# Altium PCB GamingMouse-v1.1.PcbDoc (part 1 of 3)
Units mil, origin at the board's own origin, x right, y up, seen from the top; angles counter-clockwise.
Board outline 3390 x 1696.57 mil, 2 copper layers (Top Layer, Bottom Layer), stack 61.811 mil thick; 112 components, 70 nets, 346 pads, 115 vias.
Unrouted connection lines stored in the file: 47.
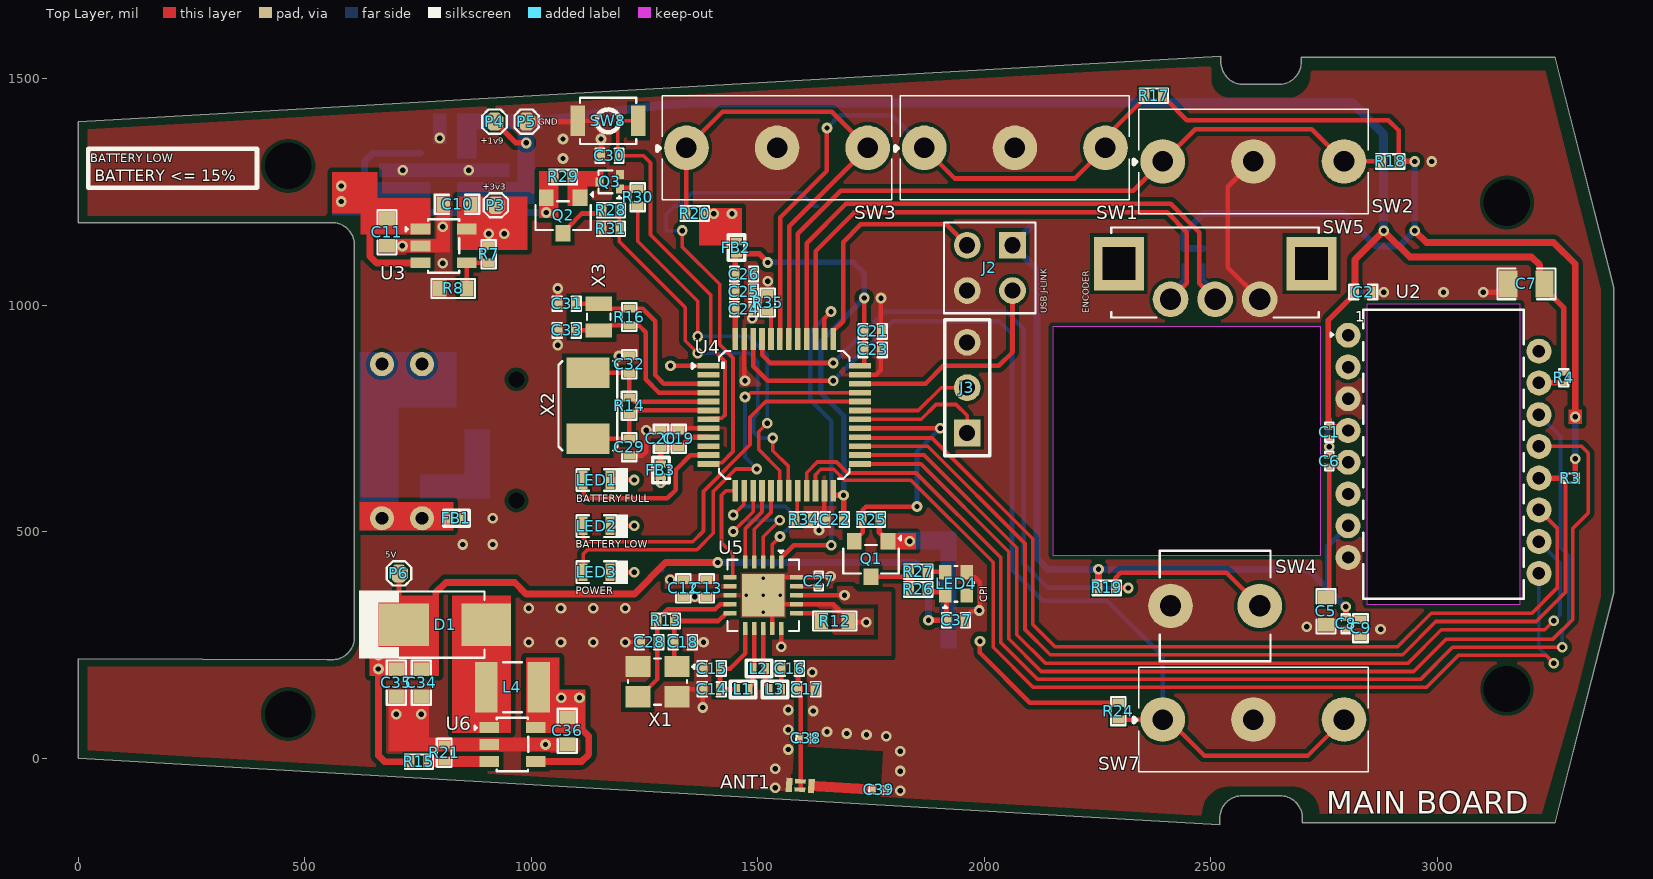
[diagram p0: Top Layer view]
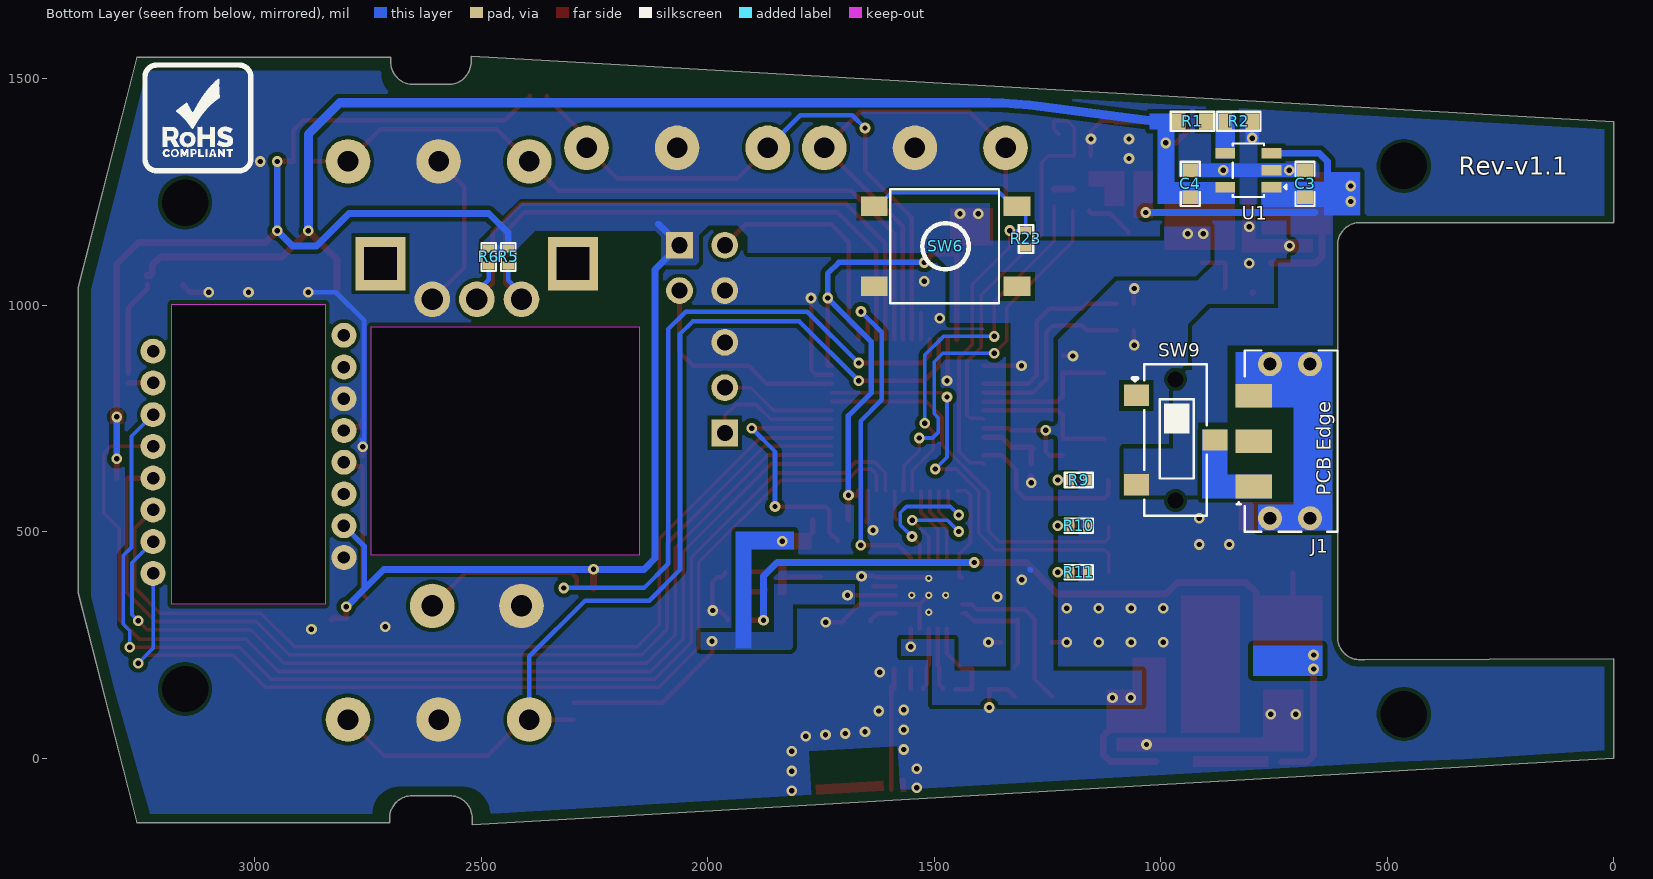
[diagram p1: Bottom Layer view, seen from below]
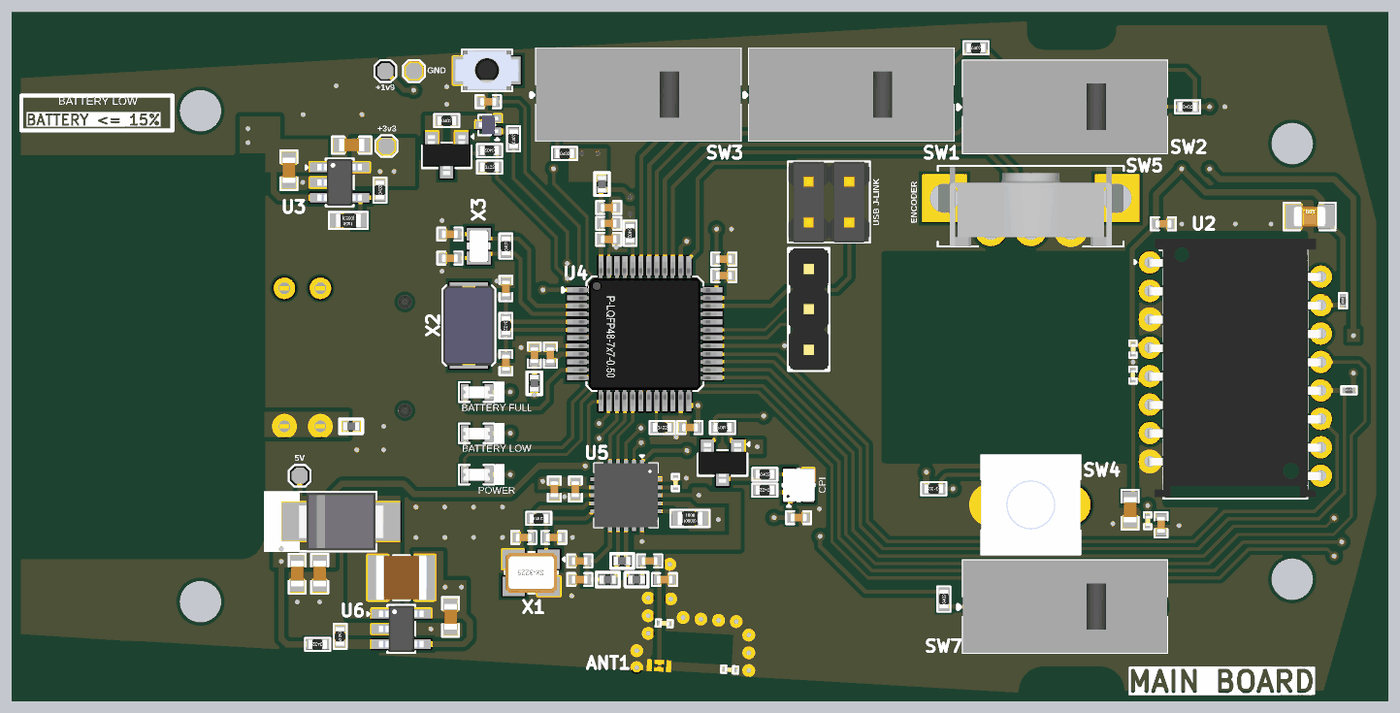
[diagram p3: 3D render of the assembled board from above, using the file's embedded part models]
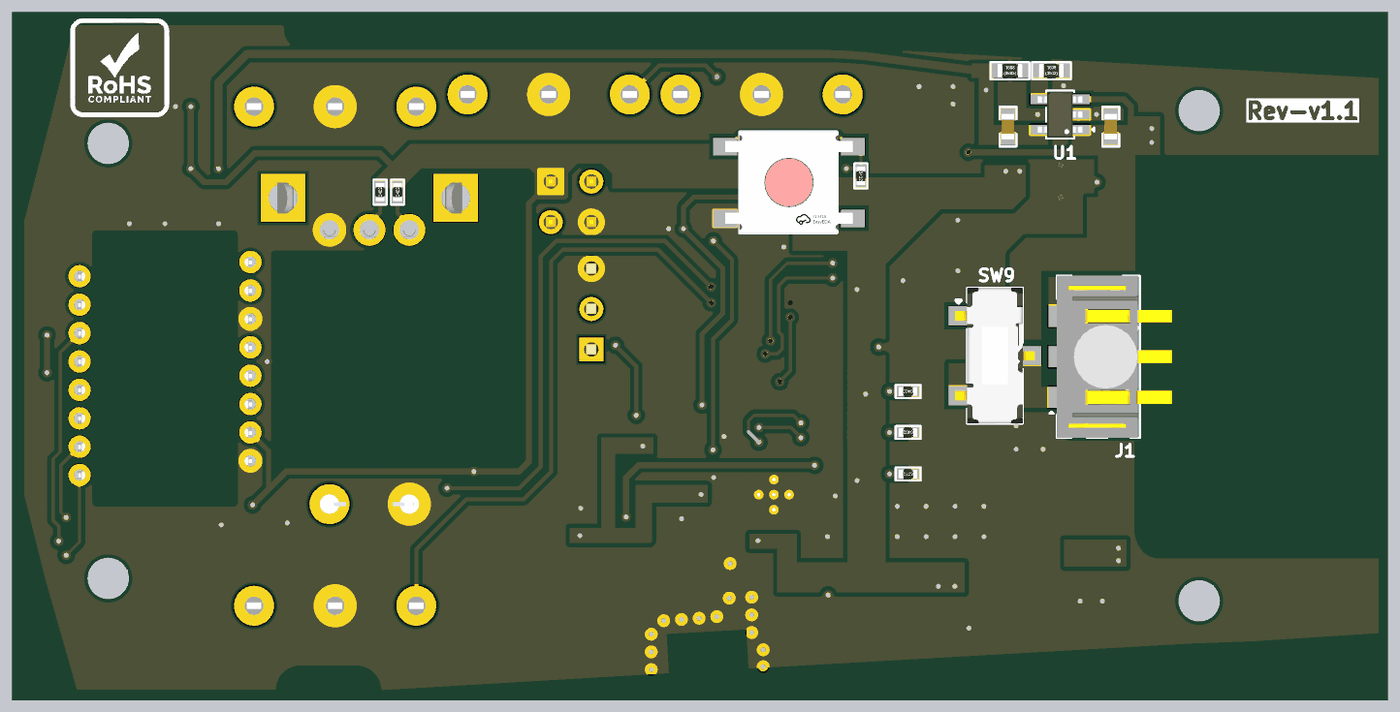
[diagram p4: 3D render of the assembled board from below, using the file's embedded part models]

## Layer stack, top to bottom
Top Solder: solder mask 0.3937, Solder Resist, Dk 3.5
Top Layer: signal copper 1.378
Dielectric 1: core 59.0551, FR-4, Dk 4.8
Bottom Layer: signal copper 1.378
Bottom Solder: solder mask 0.3937, Solder Resist, Dk 3.5

## Board outline
550,217.48 560,217.48 ccw(c560,267.48) 610,267.52 610,1132.48 ccw(c560.06,1132.54) 560,1182.48 0,1182.48 0,1405 2522.52,1550 2522.52,1537.52 ccw(c2572.46,1537.42) 2572.48,1487.48 2650,1487.48 ccw(c2650,1537.48) 2700,1537.52 2700,1547.48 3260,1547.48 3390,1040 3390,365 3260,-142.48 2702.52,-142.48 2702.52,-132.48 ccw(c2652.52,-132.48) 2652.52,-82.48 2570,-82.48 ccw(c2570,-132.48) 2520,-132.48 2520,-146.57 0,0 0,220
cut-out: 2844.6,340.22 3183.19,340.22 3183.19,1001.78 2844.6,1001.78
cut-out: 2151.69,448.47 2742.48,448.47 2742.48,952.4 2151.69,952.4

## Design rules (kind name [scope] priority, off if disabled: settings)
Clearance [All] p1: gap=10 ignorepadtopadclearanceinfootprint=TRUE except(5: Track-Track Track-THPad SMDPad-Fill; 7: Arc-Arc Arc-Track Arc-SMDPad Track-SMDPad SMDPad-SMDPad SMDPad-THPad Via-Region; 7.99: Track-Hole SMDPad-Hole THPad-Hole Via-Hole Fill-Hole Poly-Hole Region-Hole Text-Hole; 8: Arc-Hole Track-Region THPad-Poly)
HoleSize [All] p1: absolutevalues=TRUE maxlimit=150 minlimit=1 maxpercent=80.000 minpercent=20.000
MinimumSolderMaskSliver [All] p1: minsoldermaskwidth=0
PolygonConnect [All] p1: connectstyle=Direct reliefconductorwidth=15 reliefentries=4 polygonreliefangle="45 Angle" airgapwidth=10
RoutingVias [All] p1: holewidth=11.81 width=23.62 viastyle="Through Hole" minholewidth=11.81 minwidth=23.62 maxholewidth=11.81 maxwidth=23.62
SilkToSilkClearance [All] p1: silktosilkclearance=0
SilkToSolderMaskClearance [IsPad] p1: minsilkscreentomaskgap=0 clearancetoexposedcopper=TRUE
SolderMaskExpansion [All] p1: expansion=4 istentingtop=FALSE
SupplyNets "Schematic Supply Nets_5" [InNet('GND')] p1: voltage=0.000
SupplyNets "Schematic Supply Nets_4" [InNet('V_MON')] p2: voltage=0.000
SupplyNets "Schematic Supply Nets_3" [InNet('+1.9V')] p3: voltage=0.000
SupplyNets "Schematic Supply Nets_2" [InNet('5V')] p4: voltage=0.000
SupplyNets "Schematic Supply Nets_1" [InNet('V_BATT')] p5: voltage=0.000
SupplyNets "Schematic Supply Nets" [InNet('+3.3V')] p6: voltage=0.000
UnRoutedNet [All] p1: checkbadconnections=TRUE
Width Width_50OHM [InNet('ANT')] p1: maxlimit=10 minlimit=10 preferedwidth=10 impedanceprofiledriven=TRUE impedanceprofileid={56566DC3-D294-4734-A52A-A88B55A9F895} impedanceprofilevalue=50.000000 minimp=50.000000 maximp=50.000000 favimp=50.000000
Width [All] p2: maxlimit=40 minlimit=6 preferedwidth=12 minimp=50.000000 maximp=50.000000 favimp=50.000000
25 further rules are at their usual default settings.

## Components (designator, comment, footprint, x,y, rotation, side; value= is the part's Value field where it differs from the comment)
ANT1 "ANT016008LCS2442MA1" ANT016008LCS2442MA1 1593.86,-59.99 r176.8 top
C1 "0.1uF" CAP-0201 2761.86,720.01 r90 top
C2 "10uF" Cap-0402 2836.73,1029.01 r180 top
C3 "10uF" Cap-0603 681.68,1268.01 r270 bottom
C4 "10uF" Cap-0603 935.18,1268.01 r270 bottom
C5 "4.7uF" Cap-0603 2754.48,324.39 r90 top
C6 "0.1uF" CAP-0201 2761.86,656.16 r270 top
C7 "33uF" Cap-0805 3196.86,1047.01 r0 top
C8 "0.1uF" CAP-0201 2797.83,296.97 r90 top
C9 "10uF" Cap-0402 2830.82,287.39 r90 top
C10 "10uF" Cap-0603 836.39,1223.01 r0 top
C11 "10uF" Cap-0603 681.68,1161.01 r90 top
C12 "10nF" Cap-0402 1335.65,375.17 r90 top
C13 "1nF" Cap-0402 1387.65,375.17 r90 top
C14 "4.7pF" Cap-0402 1398.36,152.18 r0 top
C15 "2.2nF" Cap-0402 1398.36,198.11 r0 top
C16 "1.5pF" Cap-0402 1570.58,198.11 r0 top
C17 "1pF" Cap-0402 1607.58,152.18 r0 top
C18 "22PF" Cap-0402 1334.36,256.1 r0 top value=22pF
C19 "10nF" Cap-0402 1325.86,705.51 r270 top
C20 "1uF" Cap-0402 1286.43,705.51 r90 top
C21 "0.1uF" Cap-0402 1753.69,942.22 r180 top
C22 "0.1uF" Cap-0402 1669.95,527.01 r0 top
C23 "0.1uF" Cap-0402 1753.69,901.32 r180 top
C24 "0.1uF" Cap-0402 1469.78,991.01 r180 top
C25 "0.1uF" Cap-0402 1469.78,1030.01 r180 top
C26 "4.7uf" Cap-0402 1469.78,1069.01 r180 top
C27 "33nF" CAP-0201 1634.39,391.3 r270 top
C28 "22PF" Cap-0402 1260.36,256.1 r180 top value=22pF
C29 "22PF" Cap-0402 1216.36,686.91 r90 top value=22pF
C30 "0.1uF" Cap-0402 1172.86,1330.01 r0 top
C31 "DNP" Cap-0402 1078.36,1003.54 r0 top
C32 "22PF" Cap-0402 1216.36,869.58 r270 top value=22pF
C33 "DNP" Cap-0402 1078.36,944.48 r0 top
C34 "10uF" Cap-0603 757.36,166.94 r90 top
C35 "4.7uF" Cap-0603 702.24,166.94 r90 top
C36 "10uF" Cap-0603 1079.96,60.54 r90 top
C37 "0.1uF" Cap-0402 1937.86,304.96 r0 top
C38 "0.8pF" CAP-0201 1606.66,44.35 r176.8 top
C39 "6.2pF" CAP-0201 1767.51,-69.58 r176.8 top
D1 "SSB43L-E3/52T" SMB_ 810.31,295.01 r180 top
FB1 "100MHz" IND-0402 834.94,529.92 r0 top
FB2 "100MHz" IND-0402 1453.28,1127.06 r90 top
FB3 "100MHz" IND-0402 1286.43,635.96 r90 top
J1 "SIR1-03-S-S-K" SIR1-03-S-S-K 714.86,700 r90 bottom
J2 "G800LQ594032HR" "HDR 2X2" 2012.5,1082.5 r180 top
J3 "68000-103HLF" HDR1X3_ 1962.5,718.13 r90 top
L1 "2.7nH" IND-0402 1467.43,152.18 r180 top
L2 "8.2nH" IND-0402 1502.86,198.11 r180 top
L3 "3.9nH" IND-0402 1538.3,152.18 r0 top
L4 "DFE322520FD-4R7M=P2" IND-1210 958.78,156.94 r180 top
LED1 "Emerald" LED-0603 1144.34,614.31 r0 top
LED2 "RED" LED-0603 1144.34,512.56 r0 top
LED3 "White" LED-0603 1144.34,410.82 r0 top
LED4 "SK6812-EC20" SK6812-EC20 1937.86,384.99 r270 top
P3 "TEST POINT 0.5mm Dia" "Test-point - 0.5mm" 922.03,1220.74 r0 top
P4 "TEST POINT 0.5mm Dia" "Test-point - 0.5mm" 919.17,1405.27 r0 top
P5 "TEST POINT 0.5mm Dia" "Test-point - 0.5mm" 989.86,1405.27 r0 top
P6 "TEST POINT 0.5mm Dia" "Test-point - 0.5mm" 708.31,408.01 r0 top
Q1 "Si2302CDS" Sot-23 1750.2,440.01 r180 top
Q2 "AO3407" SOT-23 1070.44,1198.4 r180 top
Q3 "MMBT3904M" SOT-723 1173.61,1272.55 r90 top
R1 "2.5K" Res-0603 930.41,1406.01 r0 bottom
R2 "3.9K" Res-0603 828.04,1406.01 r0 bottom
R3 "10K" Res-0201 3293.91,618.45 r0 top
R4 "5.6R" Res-0201 3279.12,839.51 r90 top
R5 "10K" Res-0402 2440.53,1106.57 r90 bottom
R6 "10K" Res-0402 2483.51,1106.57 r90 bottom
R7 "6.8K" Res-0402 906.18,1112.26 r90 top
R8 "3.9K" Res-0603 828.04,1037.13 r0 top
R9 "330R" Res-0402 1181.36,614.31 r0 bottom
R10 "330R" Res-0402 1181.36,513.31 r0 bottom
R11 "330R" Res-0402 1181.36,410.82 r180 bottom
R12 "22K" Res-0603 1670.19,302.87 r180 top value=22kR
R13 "1M" Res-0402 1297.36,303.1 r0 top
R14 "1M" Res-0402 1216.36,778.24 r270 top
R15 "1M" Res-0402 752.46,-7.46 r180 top
R16 "DNP" Res-0402 1216.36,974.01 r90 top
R17 "10K" Res-0402 2374.52,1462.67 r0 top
R18 "10K" Res-0402 2896.19,1317.5 r0 top
R19 "10K" Res-0402 2270.71,376.01 r180 top
R20 "10K" Res-0402 1361.36,1202.3 r0 top
R21 "309K" Res-0402 807.96,12.04 r270 top value=309kR
R23 "10K" Res-0402 1297.95,1146.33 r270 bottom
R24 "10K" Res-0402 2295.72,104.09 r90 top
R25 "10K" Res-0402 1750.2,527.01 r180 top
R26 "10K" Res-0402 1854.36,372.74 r180 top
R27 "1K" Res-0402 1854.36,411.74 r0 top
R28 "120K" Res-0402 1176.24,1209.64 r180 top
R29 "1K" Res-0402 1070.44,1283.37 r0 top
R30 "4.7K" Res-0402 1235.18,1238.3 r90 top
R31 "330K" Res-0402 1176.24,1168.82 r0 top value=330kR
R34 "10K" Res-0402 1601.69,527.01 r0 top
R35 "10K" Res-0402 1522.34,1006.01 r270 top
SW1 "Kailh GM 8.0" "KAILH GM 8.0" 2067.75,1347.5 r0 top
SW2 "Kailh GM 8.0" "KAILH GM 8.0" 2594.25,1317.5 r0 top
SW3 "Kailh GM 8.0" "KAILH GM 8.0" 1542.86,1347.5 r0 top
SW4 "CMI629501D01" CMI629501D01 2509.76,336.39 r180 top
SW5 "E203-13G3-2412-00" E203-13G3-2412-00 2509.76,1052.64 r0 top
SW6 "GT-TS090C-H031-L5" GT-TS090C-H031-L5 1475.24,1130.18 r180 bottom
SW7 "Kailh GM 8.0" "KAILH GM 8.0" 2594.25,85.59 r0 top
SW8 "B3U-1000P" B3U-1000P 1169.86,1407.01 r180 top
SW9 "CL-SB-12B-02T" CL-SB-12B-02T 967.48,702.65 r270 bottom
U1 "LDK320M-R" SOT-23-5 806.86,1298.01 r0 bottom
U2 "PAW3395DM" PAW3395DM 3013.89,671 r0 top
U3 "LDK320M-R" SOT-23-5 806.86,1131.01 r0 top
U4 "STM32F103C8T6" "48-LQFP (7x7)_" 1558.86,758.01 r0 top
U5 "NRF24L01" "20-QFN (4x4)" 1512.39,359.8 r270 top
U6 "MT3540" SOT-23-5 958.78,30.54 r0 top
X1 "16MHz" SMD3225-4P 1278.86,169.1 r180 top
X2 "8MHz" SMD5032-2P 1125.36,778.24 r90 top
X3 "DNP" "2-SMD, (2.00mm x 1.20mm)" 1149.36,974.01 r90 top

## Footprints (in the part's own frame and the unit in brackets; to place one, negate y for a bottom-side part, rotate by r counter-clockwise, add the part's x,y. Pads: shape width x height; smd on the part's side, far side on the other; paste and mask are expansions set on the pad)
"2-SMD, (2.00mm x 1.20mm)" [mm]
  rect 0.8x1.5 smd: 1(-0.75,0) 2(0.75,0)
  silkscreen extent -0.15,-0.66 0.18,0.66, body extent -1,-0.6 1,0.6, height 0.35
"20-QFN (4x4)" [mm]
  rect 0.72x0.25 smd mask+0.07: 1(-1.87,1) 2(-1.87,0.5) 3(-1.87,0) 4(-1.87,-0.5) 5(-1.87,-1) 11(1.87,-1) 12(1.87,-0.5) 13(1.87,0) 14(1.87,0.5) 15(1.87,1)
  rect 0.25x0.72 smd mask+0.07: 6(-1,-1.87) 7(-0.5,-1.87) 8(0,-1.87) 9(0.5,-1.87) 10(1,-1.87) 16(1,1.87) 17(0.5,1.87) 18(0,1.87) 19(-0.5,1.87) 20(-1,1.87)
  round 0 / inner round 0.4 / far side round 0.4 hole 0.2: 21(-0.95,0) 21(0,0.95) 21(0,0) 21(0,-0.95) 21(0.95,0)
  rect 2.4x2.4 smd paste-2: 21(0,0)
  silkscreen extent -2.5,-2 2,2, body extent -2,-2 2,2, height 0.95
"48-LQFP (7x7)_" [mm]
  rect 1.22x0.32 smd: 1(-4.25,2.75) 2(-4.25,2.25) 3(-4.25,1.75) 4(-4.25,1.25) 5(-4.25,0.75) 6(-4.25,0.25) 7(-4.25,-0.25) 8(-4.25,-0.75) 9(-4.25,-1.25) 10(-4.25,-1.75) 11(-4.25,-2.25) 12(-4.25,-2.75) 25(4.25,-2.75) 26(4.25,-2.25) 27(4.25,-1.75) 28(4.25,-1.25) 29(4.25,-0.75) 30(4.25,-0.25) 31(4.25,0.25) 32(4.25,0.75) 33(4.25,1.25) 34(4.25,1.75) 35(4.25,2.25) 36(4.25,2.75)
  rect 0.32x1.22 smd: 13(-2.75,-4.25) 14(-2.25,-4.25) 15(-1.75,-4.25) 16(-1.25,-4.25) 17(-0.75,-4.25) 18(-0.25,-4.25) 19(0.25,-4.25) 20(0.75,-4.25) 21(1.25,-4.25) 22(1.75,-4.25) 23(2.25,-4.25) 24(2.75,-4.25) 37(2.75,4.25) 38(2.25,4.25) 39(1.75,4.25) 40(1.25,4.25) 41(0.75,4.25) 42(0.25,4.25) 43(-0.25,4.25) 44(-0.75,4.25) 45(-1.25,4.25) 46(-1.75,4.25) 47(-2.25,4.25) 48(-2.75,4.25)
  silkscreen extent -5.16,-3.58 3.66,3.58, body extent -4.51,-4.51 4.49,4.49, height 1.43
ANT016008LCS2442MA1 [mm]
  rect 0.35x0.8 smd paste-1 mask+0: 1(-0.625,0) 4(0.625,0)
  rect 0.6x0.26 smd paste-1 mask+0: 2(0,0.235) 3(0,-0.235)
B3U-1000P [mm] "SWITCH TACTILE SPST-NO 0.05A 12V"
  rect 0.82x1.72 smd: 1(-1.7,0) 2(1.7,0)
  silkscreen extent -1.57,-1.3 1.57,1.3, body extent -2,-1.26 2,1.24, height 1.6
CAP-0201 [mm]
  rect 0.3x0.3 smd mask+0.055: 1(-0.3,0) 2(0.3,0)
  silkscreen extent -0.53,-0.23 0.53,0.23, body extent -0.3,-0.15 0.3,0.15, height 0.28
Cap-0402 [mil]
  rect 18x25 smd mask+2.36: 1(-18.5,0) 2(18.5,0)
  silkscreen extent -31,-16 31,16, body extent -20,-10 20,10, height 19
Cap-0603 [mil]
  rect 30x35 smd mask+2.36: 1(-30,0) 2(30,0)
  silkscreen extent -49,-21 49,21, body extent -32,-16 31,16, height 34
Cap-0805 [mil] "SMD 0805"
  rect 40x60 smd mask+2.76: 1(-40,0) 2(40,0)
  silkscreen extent -64,-34 64,34, body extent -39,-25 39,25, height 30
CL-SB-12B-02T [mm]
  rect 1.2x1.4 smd paste+0 mask+0.051: 1(-2.5,-2.2) 2(0,2.2) 3(2.5,-2.2)
  round 0 hole 0.9 unplated: ""(-3.4,0) ""(3.4,0)
  silkscreen extent -4.25,-2.4 4.25,1.75, body extent -4.25,-2.5 4.25,2.5, height 5.5
CMI629501D01 [mm]
  round 2.5 hole 1.2: 1(-2.5,0) 2(2.5,0)
  silkscreen extent -3.1,-3.1 3.1,3.1, body extent -3.1,-3.1 3.1,3.1, height 9.5
E203-13G3-2412-00 [mm]
  rect 2.8x3 hole 1.82 square paste-2539.97 mask+0.051: 4(-5.4,1) 5(5.4,1)
  round 2 hole 1.2 paste-2539.97 mask+0.051: A(-2.5,-1) B(0,-1) C(2.5,-1)
  silkscreen extent -5.83,-2.02 5.82,3.02, body extent -5.79,-2.03 5.79,2.97, height 16.94
GT-TS090C-H031-L5 [mm]
  rect 1.5x1.1 smd paste+0 mask+0.051: 1(-4,2.25) 2(4,2.25) 3(-4,-2.25) 4(4,-2.25)
  silkscreen extent -3.1,-3.2 3,3.2, body extent -4,-3.2 4,3.2, height 4.91
HDR1X3_ [mm] "Connector; Header; 3 Position"
  rect 1.5x1.5 hole 0.9: 1(0,0)
  round 1.5 hole 0.9: 2(2.54,0) 3(5.08,0)
  silkscreen extent -1.27,-1.27 6.35,1.27, body extent -1.27,-1.24 6.35,1.25, height 8.54
"HDR 2X2" [mm]
  rect 1.5x1.5 hole 0.9: 1(-1.27,-1.27)
  round 1.5 hole 0.9: 2(-1.27,1.27) 3(1.27,-1.27) 4(1.27,1.27)
  silkscreen extent -2.57,-2.54 2.57,2.54, body extent -2.54,-2.54 2.54,2.54, height 9.5
IND-0402 [mm]
  rect 0.4x0.6 smd: 1(-0.35,0) 2(0.35,0)
  silkscreen extent -0.71,-0.46 0.71,0.46, body extent -0.5,-0.25 0.5,0.25, height 0.25
IND-1210 [mm]
  rect 1.27x2.81 smd: 1(-1.471,0) 2(1.471,0)
  silkscreen extent -0.52,-1.4 0.52,1.4, body extent -1.6,-1.4 1.6,1.4, height 2.5
"KAILH GM 8.0" [mm]
  round 2.5 hole 1.15: 1(-5.08,0) 2(0,0) 3(5.08,0)
  silkscreen extent -6.71,-2.92 6.43,2.92, body extent -6.4,-2.9 6.4,2.9, height 7.1
LED-0603 [mm]
  rect 0.5x1 smd: 1(-0.75,0) 2(0.75,0)
  silkscreen extent -1.12,-0.66 1.75,0.66, body extent -0.82,-0.37 0.82,0.36, height 0.68
PAW3395DM [mm]
  round 1.4 hole 0.7 paste-2539.97 mask+0.05: 1(-5.35,6.675) 2(-5.35,4.895) 3(-5.35,3.115) 4(-5.35,1.335) 5(-5.35,-0.445) 6(-5.35,-2.225) 7(-5.35,-4.005) 8(-5.35,-5.785) 9(5.35,-6.675) 10(5.35,-4.895) 11(5.35,-3.115) 12(5.35,-1.335) 13(5.35,0.445) 14(5.35,2.225) 15(5.35,4.005) 16(5.35,5.785)
  silkscreen extent -6.32,-8.1 4.5,8.1, body extent -5.45,-8.03 5.45,8.17, height 2.5
Res-0201 [mm]
  rect 0.27x0.37 smd mask+0.055: 1(-0.275,0) 2(0.275,0)
  silkscreen extent -0.48,-0.25 0.48,0.25, body extent -0.3,-0.15 0.3,0.15, height 0.29
Res-0402 [mil]
  rect 18x25 smd mask+2.17: 1(-18.5,0) 2(18.5,0)
  silkscreen extent -32,-17 32,16, body extent -23,-11 23,11, height 16
Res-0603 [mil]
  rect 30x35 smd: 1(-30,0) 2(30,0)
  silkscreen extent -48,-21 48,21, body extent -31,-17 31,17, height 18
SIR1-03-S-S-K [mm]
  rect 1.32x2.03 smd: 1(-2.54,2.035) 2(0,2.035) 3(2.54,2.035)
  round 1.35 hole 0.72: MH1(-4.32,1.125) MH2(4.32,1.125) MH3(4.32,-1.125) MH4(-4.32,-1.125)
  silkscreen extent -5.08,-2.67 5.08,3, body extent -5.08,-4.7 5.08,2.54, height 6.33
SK6812-EC20 [mm]
  rect 0.8x0.7 smd: 1(0.65,-0.6) 2(0.65,0.6) 3(-0.65,0.6) 4(-0.65,-0.6)
  silkscreen extent -1,-1 1.35,1, body extent -1,-1 1,1, height 0.65
SMB_ [mm]
  rect 2.8x2.4 smd: 1(-2.3,0) 2(2.3,0)
  silkscreen extent -2.21,-1.9 4.83,1.91, body extent -2.7,-1.8 2.7,1.8, height 2.3
SMD3225-4P [mm]
  rect 1.4x1.2 smd: 1(-1.1,-0.85) 2(1.1,-0.85) 3(1.1,0.85) 4(-1.1,0.85)
  silkscreen extent -2.08,-1.3 1.65,1.3, body extent -1.6,-1.25 1.6,1.25, height 0.81
SMD5032-2P [mm]
  rect 1.7x2.4 smd: 1(-1.85,0) 2(1.85,0)
  silkscreen extent -2.51,-1.65 2.51,1.65, body extent -2.5,-1.6 2.5,1.6, height 1.3
Sot-23 [mm] "TRANS NPN 40V 0.6A SOT23"
  rect 0.82x0.92 smd: 1(-0.95,-1) 2(0.95,-1) 3(0,1)
  silkscreen extent -1.68,-1.3 1.55,0.81, body extent -1.5,-1.25 1.5,1.25, height 1.05
SOT-23 [mm] "TRANS NPN 40V 0.6A SOT23"
  rect 0.82x0.92 smd: 1(-0.95,-1) 2(0.95,-1) 3(0,1)
  silkscreen extent -1.68,-1.3 1.55,0.81, body extent -1.5,-1.25 1.5,1.25, height 1.05
SOT-23-5 [mm]
  rect 1.1x0.6 smd: 1(-1.3,0.95) 2(-1.3,0) 3(-1.3,-0.95) 4(1.3,-0.95) 5(1.3,0.95)
  silkscreen extent -2.13,-1.5 0.88,1.5, body extent -1.4,-1.45 1.4,1.45, height 1.45
SOT-723 [mm]
  rect 0.5x0.45 smd: 1(-0.4,-0.575) 2(0.4,-0.575) 3(0,0.575)
  silkscreen extent -0.94,-0.66 0.64,0.64, body extent -0.6,-0.6 0.6,0.6, height 0.5
"Test-point - 0.5mm" [mm]
  oct 1x1 smd: 1(0,0)
  silkscreen extent -0.68,-0.68 0.68,0.68

## Part data
ANT1: "RF ANT 2.4GHZ CHIP SOLDER SMD", Clock Frequency=2.442GHz, Manufacturer=TDK, Category="RF Antennas", ComponentLink1Description=https://datasheet.ciiva.com/30000/rf-ant-ant016008lcs2442ma1-en-30000418.pdf?src-supplier=Avnet, ComponentLink1URL=https://datasheet.ciiva.com/30000/rf-ant-ant016008lcs2442ma1-en-30000418.pdf?src-supplier=Avnet, Height=0.016inch, Item Type=Antenna, Manufacturer Part Number=ANT016008LCS2442MA1, Mounting Technology="Surface Mount", Number of Bands=1, Packaging="Cut Tape", Pricing="1=0.2741, 10=0.2669, 25=0.2642, 100=0.2529, 250=0.2504, 500=0.2494, 1000=0.2485, 3000=0.2475, 6000=0.2466 (USD)", Reach SVHC Compliant=No, RoHS=Yes, RoHS Compliant=Yes, Series=-, Stock=9369, Supplier="Arrow Electronics", Supplier Part Number=ANT016008LCS2442MA1, Termination=Solder, VSWR=3
C1 C6 C8: library part GRM033C81E104KE14D, "CAP CER 0.1UF 25V X6S 0201", Capacitance=100nF, Case Code (Imperial)=0201, Case Code (Metric)=0603, Dielectric=X6S, Manufacturer=Murata, Max Operating Temperature=105°C, Min Operating Temperature=-55°C, Package Quantity=15000, Supplier Part Number 1=490-10403-1-ND, Tolerance=10%, Voltage Rating=25V, Case/Package=0201, Category="Ceramic Capacitors", ComponentLink1Description=http://www.mouser.com/ds/2/281/c02e-2905.pdf?src-supplier=Mouser, ComponentLink1URL=http://www.mouser.com/ds/2/281/c02e-2905.pdf?src-supplier=Mouser, ComponentLink2Description=http://www.farnell.com/datasheets/2722733.pdf?src-supplier=Farnell, ComponentLink2URL=http://www.farnell.com/datasheets/2722733.pdf?src-supplier=Farnell, ComponentLink3Description=http://search.murata.co.jp/Ceramy/image/img/A01X/G101/ENG/GRM033C81E104KE14-01.pdf?src-supplier=Digi-Key, ComponentLink3URL=http://search.murata.co.jp/Ceramy/image/img/A01X/G101/ENG/GRM033C81E104KE14-01.pdf?src-supplier=Digi-Key, Height=0.3mm, Length=0.024inch, Manufacturer Part Number=GRM033C81E104KE14D, Mount="Surface Mount", Packaging="Tape and Reel", Pricing 1="1=0.10000, 10=0.05100, 50=0.02780, 100=0.02260, 500=0.01616, 1000=0.01270, 2500=0.01155, 5000=0.01063 (USD)", RoHS=Yes, RoHS Compliant=Yes, Stock 1=91, Supplier 1=Digi-Key, Termination=SMD/SMT, Thickness=0.013inch, Voltage Rating (DC)=25V, Weight=1.2E-05oz, Width=0.3mm
C2 C9: library part CL05A106MP5NUNC, "CAP CER 10UF 10V X5R 0402", Case Code (Imperial)=0402, Case Code (Metric)=1005, Dielectric=X5R, LCSC Part Number=C315248, Manufacturer=Samsung, Max Operating Temperature=85°C, Min Operating Temperature=-55°C, Package Quantity=1, Tolerance=20%, Voltage Rating=10V, Capacitance=10uF, Case/Package=0402, Category="Ceramic Capacitors", ComponentLink1Description=https://datasheet.ciiva.com/25721/cl05a106mp5nunc-25721584.pdf?src-supplier=Digi-Key, ComponentLink1URL=https://datasheet.ciiva.com/25721/cl05a106mp5nunc-25721584.pdf?src-supplier=Digi-Key, ComponentLink2Description=https://datasheet.ciiva.com/26838/getdatasheetpartid-745310-26838170.pdf?src-supplier=Verical, ComponentLink2URL=https://datasheet.ciiva.com/26838/getdatasheetpartid-745310-26838170.pdf?src-supplier=Verical, Construction=Flat, Contact Plating=Tin, Depth=0.5mm, Item Type=Capacitor, Lead Free="Lead Free", Length=1mm, Manufacturer Part Number=CL05A106MP5NUNC, Mount="Surface Mount", Packaging="Tape and Reel", Pricing 1="10000=0.02537 (USD)", Radiation Hardening=No, RoHS=Yes, RoHS Compliant=Yes, Series=CL, Stock 1=1729850, Supplier 1=Avnet, Supplier Part Number 1=CL05A106MP5NUNC, Termination=Wraparound, Thickness=0.028inch, Width=0.02inch
C3 C4 C10 C11 C34 C36: library part C1608X5R1E106M080AC, "CAP CER 10UF 25V X5R 0603", Case Code (Imperial)=0603, Case Code (Metric)=1608, Dielectric=X5R, Dielectric Material=Ceramic, LCSC Part Number=C2168289, Manufacturer=TDK, Max Operating Temperature=85°C, Min Operating Temperature=-55°C, Package Quantity=1, Supplier Part Number 1=445-9015-1-ND, Tolerance=20%, Voltage Rating=25V, Capacitance=10uF, Case/Package=0603, Composition=Ceramic, Depth=0.8mm, Height=0.8mm, Item Type=Capacitor, Lead Free="Lead Free", Length=1.6mm, Manufacturer Part Number=C1608X5R1E106M080AC, Mount="Surface Mount", Packaging="Tape and Reel", Pricing 1="1=0.96, 10=0.704, 100=0.483, 500=0.38238, 1000=0.322 (USD)", REACH SVHC="No SVHC", Stock 1=61681, Supplier 1=Digi-Key, Termination=SMD/SMT, Thickness=0.039inch, Voltage Rating (DC)=25V, Weight=7.1E-05oz, Width=0.8mm
C5: library part C1608X5R1E475KT000E, "CAP CER, 4.7 µF, 25 V, 0603", Case Code (Imperial)=0603, Case Code (Metric)=1608, Dielectric=X5R, Dielectric Material=Ceramic, LCSC Part Number=C76615, Manufacturer=TDK, Max Operating Temperature=85°C, Min Operating Temperature=-55°C, Package Quantity=4000, Supplier Part Number 1=2220Y1000562GCT-ND, Tolerance=10%, Voltage Rating=25V, Capacitance=4.7uF, Case/Package=0603, Category="Ceramic Capacitors", ComponentLink1Description=https://datasheet.ciiva.com/48587/6print-detail-pdf-phplangenpart-noc1608x5r1e475k080acimp-unit-xmhz-48587141.pdf?src-supplier=Onlinecomponents.com, ComponentLink1URL=https://datasheet.ciiva.com/48587/6print-detail-pdf-phplangenpart-noc1608x5r1e475k080acimp-unit-xmhz-48587141.pdf?src-supplier=Onlinecomponents.com, ComponentLink2Description=https://datasheet.ciiva.com/24216/mlcc-commercial-general-en-24216326.pdf?src-supplier=Mouser, ComponentLink2URL=https://datasheet.ciiva.com/24216/mlcc-commercial-general-en-24216326.pdf?src-supplier=Mouser, ComponentLink3Description=https://datasheet.ciiva.com/48671/mlcc-commercial-general-en-48671304.pdf?src-supplier=Avnet, ComponentLink3URL=https://datasheet.ciiva.com/48671/mlcc-commercial-general-en-48671304.pdf?src-supplier=Avnet, Depth=0.8mm, Height=0.8mm, Item Type=Capacitor, Lead Free="Lead Free", Length=1.6mm, Manufacturer Part Number=C1608X5R1E475KT000E, Mount="Surface Mount", Packaging="Tape and Reel", Pricing 2="100=0.23400, 200=0.21900, 1000=0.20700, 2000=0.18700 (GBP)", REACH SVHC="No SVHC", Resistor Type=Ceramic, RoHS=No, Stock 2=16120, Supplier 1=Digi-Key, Supplier 2=RSComponents, Supplier Part Number 2=9159158P, Termination=SMD/SMT, Thickness=0.039inch, Voltage Rating (DC)=25V, Weight=7.1E-05oz, Width=0.031inch
C7: library part C2012X5R1A336MTJ00E, "10V 33uF X5R ±20% 0805 Multilayer Ceramic Capacitors MLCC - SMD/SMT ROHS", LCSC Part Number=C342635, Manufacturer=TDK, Package=0805, ComponentLink1Description=LCSC, ComponentLink1URL=https://www.lcsc.com/product-detail/Multilayer-Ceramic-Capacitors-MLCC-SMD-SMT_TDK-C2012X5R1A336MTJ00E_C342635.html, Item Type=Capacitor, Manufacturer Part Number=C2012X5R1A336MTJ00E
C12: library part CC0402KRX7R9BB103, "CAP CER 10000PF 50V X7R 0402", Case Code (Imperial)=0402, Case Code (Metric)=1005, Dielectric=X7R, LCSC Part Number=C60133, Manufacturer=Yageo, Max Operating Temperature=125°C, Min Operating Temperature=-55°C, Package Quantity=1, Resistor Type=Ceramic, Tolerance=10%, Voltage=50V, Capacitance=10nF, Case/Package=0402, Category="Ceramic Capacitors", ComponentLink1Description=https://datasheet.ciiva.com/11788/0900766b8079c870-11788375.pdf?src-supplier=RSComponents, ComponentLink1URL=https://datasheet.ciiva.com/11788/0900766b8079c870-11788375.pdf?src-supplier=RSComponents, ComponentLink2Description=https://datasheet.ciiva.com/26862/getdatasheetpartid-138248-26862642.pdf?src-supplier=Verical, ComponentLink2URL=https://datasheet.ciiva.com/26862/getdatasheetpartid-138248-26862642.pdf?src-supplier=Verical, ComponentLink3Description=https://datasheet.ciiva.com/7978/1489800-7978093.pdf?src-supplier=Element14, ComponentLink3URL=https://datasheet.ciiva.com/7978/1489800-7978093.pdf?src-supplier=Element14, ComponentLink4Description=https://datasheet.ciiva.com/28450/1489800-28450377.pdf?src-supplier=Element14, ComponentLink4URL=https://datasheet.ciiva.com/28450/1489800-28450377.pdf?src-supplier=Element14, ComponentLink5Description=https://datasheet.ciiva.com/176/mlccorderingcode-176349.pdf?src-supplier=Digi-Key, ComponentLink5URL=https://datasheet.ciiva.com/176/mlccorderingcode-176349.pdf?src-supplier=Digi-Key, ComponentLink6Description=https://datasheet.ciiva.com/176/mlccorderingcode-176348.pdf?src-supplier=Digi-Key, ComponentLink6URL=https://datasheet.ciiva.com/176/mlccorderingcode-176348.pdf?src-supplier=Digi-Key, ComponentLink7Description=https://datasheet.ciiva.com/176/mlccorderingcode-176350.pdf?src-supplier=Digi-Key, ComponentLink7URL=https://datasheet.ciiva.com/176/mlccorderingcode-176350.pdf?src-supplier=Digi-Key, Depth=0.5mm, Halogen Free="Halogen Free", Height=0.5mm, Item Type=Capacitor, Lead Free="Lead Free", Length=1mm, Manufacturer Part Number=CC0402KRX7R9BB103, Mount="Surface Mount", Packaging="Tape and Reel", Pricing 1="10000=0.00178 (USD)", Radiation Hardening=No, Reach SVHC Compliant=Yes, RoHS=Yes, RoHS Compliant=Yes, Series=CC, Stock 1=995000, Supplier 1=Avnet, Supplier Part Number 1=CC0402KRX7R9BB103, Termination=SMD/SMT, Thickness=0.022inch, Voltage Rating=50V, Voltage Rating (DC)=50V, Width=0.02inch
C13: library part CC0402KRX7R8BB102, "CAP CER 1000PF 25V X7R 0402", Case Code (Imperial)=0402, Case Code (Metric)=1005, Dielectric=X7R, Insulation Resistance=10GR, LCSC Part Number=C541372, Manufacturer=Yageo, Max Operating Temperature=125°C, Min Operating Temperature=-55°C, Tolerance=10%, Voltage Rating=25V, Capacitance=1nF, Case/Package=0402, Category="Ceramic Capacitors", ComponentLink1Description=https://datasheet.ciiva.com/26862/getdatasheetpartid-639817-26862638.pdf?src-supplier=Verical, ComponentLink1URL=https://datasheet.ciiva.com/26862/getdatasheetpartid-639817-26862638.pdf?src-supplier=Verical, ComponentLink2Description=https://datasheet.ciiva.com/5425/upy-gp-np0-16v-to-50v-8-3714-5425527.pdf?src-supplier=Mouser, ComponentLink2URL=https://datasheet.ciiva.com/5425/upy-gp-np0-16v-to-50v-8-3714-5425527.pdf?src-supplier=Mouser, Depth=0.5mm, Dissipation Factor=2.5%, Halogen Free="Halogen Free", Item Type=Capacitor, Lead Free="Lead Free", Length=1mm, Manufacturer Part Number=CC0402KRX7R8BB102, Mount="Surface Mount", Number of Pins=2, Packaging="Tape and Reel", Pricing 1="1=0.00230, 10000=0.00230, 100001=0.00190 (USD)", Radiation Hardening=No, RoHS=Yes, RoHS Compliant=Yes, Series=CC, Stock 1=370000, Supplier 1="Arrow Electronics", Supplier Part Number 1=CC0402KRX7R8BB102, Termination=SMD/SMT, Thickness=0.022inch, Voltage Rating (DC)=25V, Width=0.02inch
C14: library part CC0402BRNPO9BN4R7, "CAP CER 4.7PF 50V C0G/NPO 0402", Case Code (Imperial)=0402, Case Code (Metric)=1005, Dielectric=C0G, LCSC Part Number=C325453, Manufacturer=Yageo, Max Operating Temperature=125°C, Min Operating Temperature=-55°C, Package Quantity=10000, Supplier Part Number=8379141, Voltage Rating=50V, Case/Package=0402, Category="Ceramic Capacitors", ComponentLink1Description=https://datasheet.ciiva.com/11587/upy-gp-np0-16v-to-50v-8-11587134.pdf?src-supplier=Avnet, ComponentLink1URL=https://datasheet.ciiva.com/11587/upy-gp-np0-16v-to-50v-8-11587134.pdf?src-supplier=Avnet, ComponentLink2Description=https://datasheet.ciiva.com/13385/upy-gp-np0-16v-to-50v-8-13385886.pdf?src-supplier=Mouser, ComponentLink2URL=https://datasheet.ciiva.com/13385/upy-gp-np0-16v-to-50v-8-13385886.pdf?src-supplier=Mouser, Depth=0.5mm, Halogen Free=5694HalogenFree, Item Type=Capacitor, Lead Free="Lead Free", Length=1mm, Manufacturer Part Number=CC0402BRNPO9BN4R7, Mounting Technology="Surface Mount", Packaging="Tape and Reel", Pricing="10000=0.0031, 40000=0.0029, 150000=0.0027, 250000=0.0027, 500000=0.0025 (USD)", Radiation Hardening=No, RoHS=Yes, RoHS Compliant=Yes, Series=CC, Stock=80000, Supplier="Future Electronics", Termination=SMD/SMT, Voltage Rating (DC)=50V, Width=0.5mm
C15: library part 04025C222JAT2A, "CAP CER 2.2nF 50V X7R ±5% 0402 MLCC - SMD/SMT ROHS", LCSC Part Number=C597041, Manufacturer="Kyocera AVX", Package=0402, ComponentLink1Description=LCSC, ComponentLink1URL=https://www.lcsc.com/product-detail/Multilayer-Ceramic-Capacitors-MLCC-SMD-SMT_Kyocera-AVX-04025C222JAT2A_C597041.html, Item Type=Capacitor, Manufacturer Part Number=04025C222JAT2A
C16: library part CC0402BRNPO9BN1R5, "CAP CER 1.5PF 50V C0G/NPO 0402", LCSC Part Number=C282238, Manufacturer=Yageo, Supplier Part Number=6564710, Temperature Coefficient=30ppm/°C, Category="Ceramic Capacitors", ComponentLink1Description=https://datasheet.ciiva.com/15189/getdatasheetpartid-403423-15189101.pdf?src-supplier=Verical, ComponentLink1URL=https://datasheet.ciiva.com/15189/getdatasheetpartid-403423-15189101.pdf?src-supplier=Verical, ComponentLink2Description=https://datasheet.ciiva.com/11587/upy-gp-np0-16v-to-50v-8-11587119.pdf?src-supplier=Avnet, ComponentLink2URL=https://datasheet.ciiva.com/11587/upy-gp-np0-16v-to-50v-8-11587119.pdf?src-supplier=Avnet, ComponentLink3Description=https://datasheet.ciiva.com/13263/upy-gp-np0-16v-to-50v-8-3714-13263317.pdf?src-supplier=Mouser, ComponentLink3URL=https://datasheet.ciiva.com/13263/upy-gp-np0-16v-to-50v-8-3714-13263317.pdf?src-supplier=Mouser, Halogen Free=5694HalogenFree, Item Type=Capacitor, Manufacturer Part Number=CC0402BRNPO9BN1R5, Pricing="10000=0.0033, 40000=0.0031, 150000=0.003, 300000=0.0029, 750000=0.0027 (USD)", RoHS=Yes, Stock=530000, Supplier="Future Electronics"
C17: library part CC0402BRNPO9BN1R0, "CAP CER 1PF 50V C0G/NPO 0402", LCSC Part Number=C309455, Manufacturer=Yageo, Supplier Part Number=7847221, Temperature Coefficient=30ppm/°C, Category="Ceramic Capacitors", ComponentLink1Description=https://datasheet.ciiva.com/26862/getdatasheetpartid-403422-26862565.pdf?src-supplier=Verical, ComponentLink1URL=https://datasheet.ciiva.com/26862/getdatasheetpartid-403422-26862565.pdf?src-supplier=Verical, ComponentLink2Description=https://datasheet.ciiva.com/11587/upy-gp-np0-16v-to-50v-8-11587115.pdf?src-supplier=Avnet, ComponentLink2URL=https://datasheet.ciiva.com/11587/upy-gp-np0-16v-to-50v-8-11587115.pdf?src-supplier=Avnet, Halogen Free=5694HalogenFree, Item Type=Capacitor, Manufacturer Part Number=CC0402BRNPO9BN1R0, Pricing="10000=0.0034, 40000=0.0032, 150000=0.0031, 250000=0.003, 500000=0.0028 (USD)", RoHS=Yes, Stock=180000, Supplier="Future Electronics"
C18 C28 C29 C32: library part CC0402JRNPO9BN220, "CAP CER 22PF 50V C0G/NPO 0402", Case Code (Imperial)=0402, Case Code (Metric)=1005, Dielectric=C0G, Dielectric Material=Ceramic, Insulation Resistance=100GR, LCSC Part Number=C106203, Manufacturer=Yageo, Max Operating Temperature=125°C, Min Operating Temperature=-55°C, Package Quantity=1, Supplier Part Number 1=9105957, Temperature Coefficient=30ppm/°C, Tolerance=5%, Voltage=50V, Case/Package=0402, Category="Ceramic Capacitors", ComponentLink1Description=https://datasheet.ciiva.com/5789/1443161-5789509.pdf?src-supplier=Farnell, ComponentLink1URL=https://datasheet.ciiva.com/5789/1443161-5789509.pdf?src-supplier=Farnell, ComponentLink2Description=https://datasheet.ciiva.com/8033/1443161-8033606.pdf?src-supplier=Element14, ComponentLink2URL=https://datasheet.ciiva.com/8033/1443161-8033606.pdf?src-supplier=Element14, ComponentLink3Description=https://datasheet.ciiva.com/7656/1132289-7656615.pdf?src-supplier=Element14, ComponentLink3URL=https://datasheet.ciiva.com/7656/1132289-7656615.pdf?src-supplier=Element14, ComponentLink4Description=https://datasheet.ciiva.com/8033/1443161-8033607.pdf?src-supplier=Element14, ComponentLink4URL=https://datasheet.ciiva.com/8033/1443161-8033607.pdf?src-supplier=Element14, ComponentLink5Description=https://datasheet.ciiva.com/8033/1443161-8033605.pdf?src-supplier=Element14, ComponentLink5URL=https://datasheet.ciiva.com/8033/1443161-8033605.pdf?src-supplier=Element14, ComponentLink6Description=https://datasheet.ciiva.com/143/mlccorderingcode-143987.pdf?src-supplier=Digi-Key, ComponentLink6URL=https://datasheet.ciiva.com/143/mlccorderingcode-143987.pdf?src-supplier=Digi-Key, ComponentLink7Description=https://datasheet.ciiva.com/143/mlccorderingcode-143986.pdf?src-supplier=Digi-Key, ComponentLink7URL=https://datasheet.ciiva.com/143/mlccorderingcode-143986.pdf?src-supplier=Digi-Key, ComponentLink8Description=https://datasheet.ciiva.com/143/mlccorderingcode-143988.pdf?src-supplier=Digi-Key, ComponentLink8URL=https://datasheet.ciiva.com/143/mlccorderingcode-143988.pdf?src-supplier=Digi-Key, ComponentLink9Description=https://datasheet.ciiva.com/5425/upy-gp-np0-16v-to-50v-8-5425483.pdf?src-supplier=Mouser, ComponentLink9URL=https://datasheet.ciiva.com/5425/upy-gp-np0-16v-to-50v-8-5425483.pdf?src-supplier=Mouser, ComponentLink10Description=https://datasheet.ciiva.com/15189/getdatasheetpartid-370074-15189117.pdf?src-supplier=Verical, ComponentLink10URL=https://datasheet.ciiva.com/15189/getdatasheetpartid-370074-15189117.pdf?src-supplier=Verical, Depth=0.5mm, Height=0.5mm, Item Type=Capacitor, Lead Free="Lead Free", Length=1mm, Manufacturer Part Number=CC0402JRNPO9BN220, Mounting Technology="Surface Mount", Packaging="Tape and Reel", Pins=2, Pricing 1="10000=0.00220, 40000=0.00210, 150000=0.00200, 400000=0.00190, 1000000=0.00180 (USD)", Radiation Hardening=No, Reach SVHC Compliant=Yes, Resistor Type=Ceramic, RoHS=Yes, RoHS Compliant=Yes, Series=CC, Stock 1=200000, Supplier 1="Future Electronics", Termination=SMD/SMT, Thickness=0.022inch, Voltage Rating=50V, Voltage Rating (DC)=50V, Width=0.02inch
C19: library part CC0402KRX7R8BB103, "CAP CER 10000PF 25V X7R 0402", Case Code (Imperial)=0402, Case Code (Metric)=1005, Dielectric=X7R, LCSC Part Number=C327025, Manufacturer=Yageo, Max Operating Temperature=125°C, Min Operating Temperature=-55°C, Package Quantity=1, Supplier Part Number 1=311-1337-1-ND, Tolerance=10%, Voltage Rating=25V, Capacitance=10nF, Case/Package=0402, ComponentLink1Description=http://www.yageo.com/documents/recent/UPY-GPHC_X7R_6.3V-to-50V_18.pdf?src-supplier=Digi-Key, ComponentLink1URL=http://www.yageo.com/documents/recent/UPY-GPHC_X7R_6.3V-to-50V_18.pdf?src-supplier=Digi-Key, ComponentLink2Description=https://www.verical.com/server-webapp/html/getDatasheet?partID=375418&src-supplier=Verical, ComponentLink2URL=https://www.verical.com/server-webapp/html/getDatasheet?partID=375418&src-supplier=Verical, ComponentLink3Description=http://www.yageo.com/documents/recent/UPY-GPHC_X7R_6.3V-to-50V_8.pdf?src-supplier=Avnet, ComponentLink3URL=http://www.yageo.com/documents/recent/UPY-GPHC_X7R_6.3V-to-50V_8.pdf?src-supplier=Avnet, ComponentLink4Description=https://4donline.ihs.com/images/VipMasterIC/IC/YAGO/YAGO-S-A0003557223/YAGO-S-A0003557223-1.pdf?hkey=52A5661711E402568146F3353EA87419&src-supplier=Element14, ComponentLink4URL=https://4donline.ihs.com/images/VipMasterIC/IC/YAGO/YAGO-S-A0003557223/YAGO-S-A0003557223-1.pdf?hkey=52A5661711E402568146F3353EA87419&src-supplier=Element14, ComponentLink5Description=http://www.farnell.com/datasheets/2167236.pdf?src-supplier=Element14, ComponentLink5URL=http://www.farnell.com/datasheets/2167236.pdf?src-supplier=Element14, ComponentLink6Description=http://www.mouser.com/ds/2/447/Yageo_UPY-GP_NP0_16V-to-50V_9-358835.pdf?src-supplier=Mouser, ComponentLink6URL=http://www.mouser.com/ds/2/447/Yageo_UPY-GP_NP0_16V-to-50V_9-358835.pdf?src-supplier=Mouser, Composition=Ceramic, Depth=0.5mm, Halogen Free="Halogen Free", Height=0.5mm, Lead Free="Lead Free", Length=1mm, Manufacturer Part Number=CC0402KRX7R8BB103, Mount="Surface Mount", Packaging="Tape and Reel", Pricing 1="1=0.1, 10=0.021, 100=0.0093, 500=0.00666, 1000=0.00523, 2500=0.00476, 5000=0.00438 (USD)", Radiation Hardening=No, REACH SVHC=Unknown, Stock 1=0, Supplier 1=Digi-Key, Termination=SMD/SMT, Thickness=0.022inch, Voltage Rating (DC)=25V, Width=0.02inch
C20: library part CC0402KRX5R8BB105, "CAP CER 1UF 25V X5R 0402", Case Code (Imperial)=0402, Case Code (Metric)=1005, Dielectric=X5R, LCSC Part Number=C326568, Manufacturer=Yageo, Max Operating Temperature=85°C, Min Operating Temperature=-55°C, Package Quantity=10000, Supplier Part Number 1=603-CC402KRX5R8BB105, Tolerance=10%, Voltage Rating=25V, Capacitance=1uF, Case/Package=0402, Category="Ceramic Capacitors", ComponentLink1Description=http://www.mouser.com/ds/2/447/Yageo_UPY-GP_NP0_16V-to-50V_9-358835.pdf?src-supplier=Mouser, ComponentLink1URL=http://www.mouser.com/ds/2/447/Yageo_UPY-GP_NP0_16V-to-50V_9-358835.pdf?src-supplier=Mouser, ComponentLink2Description=http://www.yageo.com/documents/recent/UPY-GPHC_X5R_4V-to-50V_25.pdf?src-supplier=Digi-Key, ComponentLink2URL=http://www.yageo.com/documents/recent/UPY-GPHC_X5R_4V-to-50V_25.pdf?src-supplier=Digi-Key, ComponentLink3Description=https://4donline.ihs.com/images/VipMasterIC/IC/YAGO/YAGO-S-A0006851646/YAGO-S-A0006851646-1.pdf?hkey=6D3A4C79FDBF58556ACFDE234799DDF0&src-supplier=Newark, ComponentLink3URL=https://4donline.ihs.com/images/VipMasterIC/IC/YAGO/YAGO-S-A0006851646/YAGO-S-A0006851646-1.pdf?hkey=6D3A4C79FDBF58556ACFDE234799DDF0&src-supplier=Newark, Halogen Free="Halogen Free", Lead Free="Lead Free", Length=0.039inch, Manufacturer Part Number=CC0402KRX5R8BB105, Mount="Surface Mount", Packaging="Tape and Reel", Pricing 1="1=0.30000, 10=0.20400, 50=0.20400, 100=0.11600, 1000=0.07200, 10000=0.05900 (USD)", RoHS=Yes, RoHS Compliant=Yes, Stock 1=91975, Supplier 1=Mouser, Termination=SMD/SMT, Thickness=0.022inch, Voltage Rating (DC)=25V, Weight=2.3E-05oz, Width=0.02inch
C21 C22 C23 C24 C25 C30 C37: library part C1005X5R1H104K050BB, "CAP CER 0.1UF 50V X5R 0402", Capacitance=100nF, Case Code (Imperial)=0402, Case Code (Metric)=1005, Dielectric=X5R, Dielectric Material=Ceramic, LCSC Part Number=C2181865, Manufacturer=TDK, Max Operating Temperature=85°C, Min Operating Temperature=-55°C, Package Quantity=1, Supplier Part Number 1=445-5942-1-ND, Tolerance=10%, Voltage=50V, Case/Package=0402, ComponentLink1Description=https://product.tdk.com/info/en/catalog/spec/mlccspec_commercial_general_midvoltage_en.pdf?src-supplier=Digi-Key, ComponentLink1URL=https://product.tdk.com/info/en/catalog/spec/mlccspec_commercial_general_midvoltage_en.pdf?src-supplier=Digi-Key, ComponentLink2Description=http://www.tdk.co.jp/tefe02/e413_c.pdf?src-supplier=Future+Electronics, ComponentLink2URL=http://www.tdk.co.jp/tefe02/e413_c.pdf?src-supplier=Future+Electronics, ComponentLink3Description=https://www.verical.com/server-webapp/html/getDatasheet?partID=743571&src-supplier=Verical, ComponentLink3URL=https://www.verical.com/server-webapp/html/getDatasheet?partID=743571&src-supplier=Verical, ComponentLink4Description=http://www.tdk.co.jp/tefe02/e412_c.pdf?src-supplier=Avnet+Europe, ComponentLink4URL=http://www.tdk.co.jp/tefe02/e412_c.pdf?src-supplier=Avnet+Europe, Construction=Flat, Depth=0.5mm, Height=0.5mm, Lead Free="Lead Free", Length=1mm, Manufacturer Part Number=C1005X5R1H104K050BB, Mount="Surface Mount", Packaging="Tape and Reel", Pricing 1="1=0.12, 10=0.09, 50=0.049, 100=0.04, 500=0.02858, 1000=0.02245, 2500=0.02041, 5000=0.01878 (USD)", Radiation Hardening=No, REACH SVHC="No SVHC", Resistor Type=Ceramic, RoHS Compliant=Yes, Series=C, Stock 1=1455182, Supplier 1=Digi-Key, Termination=SMD/SMT, Thickness=0.022inch, Voltage Rating=50V, Voltage Rating (DC)=50V, Weight=2.3E-05oz, Width=0.02inch
  C21 C22 C23 C24 C25 C30: Item Type=Capacitor
C26: library part EDK105BBJ475MVLF, "16V 4.7uF ±20% 0402 Multilayer Ceramic Capacitors", LCSC Part Number=C412302, Manufacturer="Taiyo Yuden", ComponentLink1Description=LCSC, ComponentLink1URL=https://www.lcsc.com/product-detail/Multilayer-Ceramic-Capacitors-MLCC-SMD-SMT_Taiyo-Yuden-EDK105BBJ475MVLF_C412302.html, Item Type=Capacitor, Manufacturer Part Number=EDK105BBJ475MVLF
C27: library part FN03B333K100PLG, "10V 33nF ±10% 0201 Multilayer Ceramic Capacitors MLCC - SMD/SMT ROHS", LCSC Part Number=C565516, Manufacturer=PSA, Package=0201, Item Type=Capacitor, Manufacturer Part Number=FN03B333K100PLG
C31 C33: library part 0402CG8R0C500NT, "50V 8pF C0G 0402 Multilayer Ceramic Capacitors MLCC - SMD/SMT ROHS", LCSC Part Number=C1578, Manufacturer="FH (Guangdong Fenghua Advanced Tech)", Package=0402, ComponentLink1Description=LCSC, ComponentLink1URL=https://www.lcsc.com/product-detail/Multilayer-Ceramic-Capacitors-MLCC-SMD-SMT_FH-Guangdong-Fenghua-Advanced-Tech-0402CG8R0C500NT_C1578.html, Item Type=Capacitor, Manufacturer Part Number=0402CG8R0C500NT
C35: library part CC0603KRX5R7BB475, "CAP CER 4.7UF 16V X5R 0603", Case Code (Imperial)=0603, Case Code (Metric)=1608, Dielectric=X5R, LCSC Part Number=C277476, Manufacturer=Yageo, Max Operating Temperature=85°C, Min Operating Temperature=-55°C, Resistor Type=Ceramic, Supplier Part Number 1=311-1785-1-ND, Tolerance=10%, Voltage Rating=16V, Capacitance=4.7uF, Case/Package=0603, Category="Ceramic Capacitors", ComponentLink1Description=http://www.mouser.com/ds/2/447/UPY-GPHC_X5R_4V-to-50V_25-1131599.pdf?src-supplier=Mouser, ComponentLink1URL=http://www.mouser.com/ds/2/447/UPY-GPHC_X5R_4V-to-50V_25-1131599.pdf?src-supplier=Mouser, ComponentLink2Description=http://www.yageo.com/documents/recent/UPY-GPHC_X5R_4V-to-50V_25.pdf?src-supplier=Digi-Key, ComponentLink2URL=http://www.yageo.com/documents/recent/UPY-GPHC_X5R_4V-to-50V_25.pdf?src-supplier=Digi-Key, Depth=0.8mm, Halogen Free="Halogen Free", Height=0.8mm, Item Type=Capacitor, Lead Free="Lead Free", Length=1.6mm, Manufacturer Part Number=CC0603KRX5R7BB475, Mount="Surface Mount", Packaging="Tape and Reel", Pricing 1="1=0.20000, 10=0.13800, 50=0.08280, 100=0.06990, 500=0.04784, 1000=0.04233 (USD)", RoHS=Yes, RoHS Compliant=Yes, Series=CC, Stock 1=547703, Supplier 1=Digi-Key, Termination=SMD/SMT, Thickness=0.037inch, Voltage Rating (DC)=16V, Weight=7.1E-05oz, Width=0.8mm
C38: library part CC0201BRNPO8BNR80, "CAP CER 0.8PF 25V C0G/NP0 0201", LCSC Part Number=C5182417, Manufacturer=Yageo, Supplier Part Number=13-CC0201BRNPO8BNR80CT-ND, Category="Ceramic Capacitors", Item Type=Capacitor, Manufacturer Part Number=CC0201BRNPO8BNR80, Pricing="1=0.1, 10=0.015, 50=0.0088, 100=0.0069, 500=0.00516, 1000=0.00406, 2500=0.00369, 5000=0.00339 (USD)", RoHS=No, Supplier=Digikey
C39: library part CC0201BRNPO9BN6R2, "CAP CER 6.2PF 50V C0G/NP0 0201", LCSC Part Number=C5591166, Manufacturer=Yageo, Supplier Part Number=13-CC0201BRNPO9BN6R2TR-ND, Category="Ceramic Capacitors", Item Type=Capacitor, Manufacturer Part Number=CC0201BRNPO9BN6R2, Pricing="15000=0.00295 (USD)", RoHS=No, Supplier=Digikey
D1: "DIODE SCHOTTKY 30V 4A DO214AA", Average Rectified Current=4A, Case/Package=DO-214AA, Forward Voltage=450mV, LCSC Part Number=C222519, Manufacturer="Vishay Semiconductors", Max Forward Surge Current (Ifsm)=100A, Max Operating Temperature=150°C, Max Repetitive Reverse Voltage (Vrrm)=30V, Max Reverse Current=600uA, Min Operating Temperature=-65°C, Package Quantity=1, Reverse Voltage=21V, Supplier Part Number=625-SSB43L-E3, Category="Rectifier Diodes", ComponentLink1Description=https://datasheet.ciiva.com/14634/0900766b80dd0508-14634162.pdf?src-supplier=Allied+Electronics, ComponentLink1URL=https://datasheet.ciiva.com/14634/0900766b80dd0508-14634162.pdf?src-supplier=Allied+Electronics, ComponentLink2Description=https://datasheet.ciiva.com/4245/ssb43l-4245635.pdf?src-supplier=Arrow+Electronics, ComponentLink2URL=https://datasheet.ciiva.com/4245/ssb43l-4245635.pdf?src-supplier=Arrow+Electronics, ComponentLink3Description=https://datasheet.ciiva.com/15224/getdatasheetpartid-99263-15224680.pdf?src-supplier=Verical, ComponentLink3URL=https://datasheet.ciiva.com/15224/getdatasheetpartid-99263-15224680.pdf?src-supplier=Verical, ComponentLink4Description=https://datasheet.ciiva.com/7962/64541-7962449.pdf?src-supplier=Element14, ComponentLink4URL=https://datasheet.ciiva.com/7962/64541-7962449.pdf?src-supplier=Element14, ComponentLink5Description=https://datasheet.ciiva.com/18434/70217334-18434422.pdf?src-supplier=Allied+Electronics, ComponentLink5URL=https://datasheet.ciiva.com/18434/70217334-18434422.pdf?src-supplier=Allied+Electronics, Current Rating=4A, Forward Current=4A, Height=0.095inch, Item Type=Diode, Lead Free=5697LeadFree, Length=4.7mm, Manufacturer Part Number=SSB43L-E3/52T, Max Reverse Leakage Current=600uA, Max Reverse Voltage (DC)=30V, Max Surge Current=100A, Mounting Technology="Surface Mount", Output Current=4A, Packaging="Tape and Reel", Peak Non-Repetitive Surge Current=100A, Pins=2, Polarity=4901Direction, Pricing="1=0.55, 10=0.472, 50=0.472, 100=0.332, 1000=0.187, 10000=0.167 (USD)", Radiation Hardening=No, Reach SVHC Compliant=Unknown, RoHS=Yes, RoHS Compliant=Yes, Stock=10903, Supplier=Mouser, Voltage Rating (DC)=30V, Width=3.8mm
FB1 FB2 FB3: library part MFBM1V1005-102-R, "FERRITE BEAD 1 OHM 0402 1LN", Manufacturer="Eaton Bussmann", Category="Ferrite Beads and Chips", ComponentLink1Description=https://datasheet.octopart.com/MFBM1V1005-102-R-Cooper-Bussmann-datasheet-147669133.pdf?src-supplier=Sager+Electronics, ComponentLink1URL=https://datasheet.octopart.com/MFBM1V1005-102-R-Cooper-Bussmann-datasheet-147669133.pdf?src-supplier=Sager+Electronics, Item Type="Ferrite Bead", Manufacturer Part Number=MFBM1V1005-102-R, Pricing="10000=0.0074, 30000=0.0072, 50000=0.0067 (USD)", RoHS=No, Stock=60000, Supplier="Arrow Electronics", Supplier Part Number=MFBM1V1005-102-R
J1: ".100\" RIGHT-ANGLE ONE-PIECE INTE", Manufacturer=Samtec, Supplier Part Number=612-SIR1-03-S-S-K-ND, Category=Connectors, Contact Material=Bronze, Contact Plating=Gold, Item Type="Spring Compression Contact", Manufacturer Part Number=SIR1-03-S-S-K, Pricing="55=5.28127 (USD)", RoHS=Yes, RoHS Compliant=Yes, Supplier=Digikey
J2: "PIN HEADER 2.54MM PITCH STR DIP,", Manufacturer=Amphenol, Supplier Part Number=664-G800LQ594032HR-ND, Category=Connectors, Item Type="Male Header", Manufacturer Part Number=G800LQ594032HR, Pricing="1=0.19, 10=0.159, 100=0.1221, 500=0.10332, 1000=0.08454, 5000=0.07514, 10000=0.0681 (USD)", RoHS=No, Stock=4587, Supplier=Digikey
J3: "CONN HEADER VERT 3POS 2.54MM", Current Rating=3A, Flammability Rating="UL94 V-0", Housing Color=Black, Insulation Resistance=5GR, LCSC Part Number=C168677, Max Operating Temperature=125°C, Max Voltage Rating (AC)=1.5kV, Min Operating Temperature=-65°C, Package Quantity=100, Supplier Part Number=88K1775, Category="Headers and Wire Housings", ComponentLink1Description=LCSC, ComponentLink2Description=https://datasheet.ciiva.com/46392/1914865-46392021.pdf?src-supplier=Element14, ComponentLink2URL=https://datasheet.ciiva.com/46392/1914865-46392021.pdf?src-supplier=Element14, Contact Gender=Male, Contact Material=Bronze, Contact Mating Length=5.84mm, Contact Plating=Gold,GXT, Contact Post Length=2.41mm, Depth=2.41mm, Housing Material=Thermoplastic, Item Type="Male Header", Length=7.62mm, Number of Contacts=3, Number of Positions=3, Number of Rows=1, Orientation=Straight, Packaging=Bulk, Pitch=2.54mm, Pricing="1=0.395, 10=0.31, 25=0.29, 50=0.27, 100=0.25 (USD)", Radiation Hardening=No, Reach SVHC Compliant=No, RoHS=No, Series=68000, Stock=2805, Supplier=Avnet, Termination="Through Hole", Voltage Rating=1.5kV
L1: library part CS0402-2N7J-S, "640mA 2.7nH ±5% 120mΩ 0402 Inductors (SMD) ROHS", LCSC Part Number=C142181, Manufacturer="Chilisin Elec", Package=0402, ComponentLink1Description=LCSC, ComponentLink1URL=https://www.lcsc.com/product-detail/Inductors-SMD_Chilisin-Elec-CS0402-2N7J-S_C142181.html, Item Type=Inductors, Manufacturer Part Number=CS0402-2N7J-S
L2: library part LQG15HS8N2J02D, "FIXED IND 8.2NH 550MA 240MOHM SM", Case Code (Imperial)=0402, Case Code (Metric)=1005, Current Rating=300mA, DC Resistance (DCR)=240mR, LCSC Part Number=C98003, Manufacturer=Murata, Max Operating Temperature=125°C, Min Operating Temperature=-55°C, Package Quantity=1, Self Resonant Frequency=3.7GHz, Supplier Part Number=81-LQG15HS8N2J02D, Test Frequency=100MHz, Tolerance=5%, Case/Package=0402, Category="Fixed Inductors", ComponentLink1Description=https://datasheet.ciiva.com/11799/0900766b8090d685-11799047.pdf?src-supplier=Rs, ComponentLink1URL=https://datasheet.ciiva.com/11799/0900766b8090d685-11799047.pdf?src-supplier=Rs, ComponentLink2Description=https://datasheet.ciiva.com/1038/l0075s0083lqg15hs-1038112.pdf?src-supplier=Digikey, ComponentLink2URL=https://datasheet.ciiva.com/1038/l0075s0083lqg15hs-1038112.pdf?src-supplier=Digikey, ComponentLink3Description=https://datasheet.ciiva.com/1038/l0075s0083lqg15hs-1038113.pdf?src-supplier=Digikey, ComponentLink3URL=https://datasheet.ciiva.com/1038/l0075s0083lqg15hs-1038113.pdf?src-supplier=Digikey, ComponentLink4Description=https://datasheet.ciiva.com/1038/l0075s0083lqg15hs-1038114.pdf?src-supplier=Digikey, ComponentLink4URL=https://datasheet.ciiva.com/1038/l0075s0083lqg15hs-1038114.pdf?src-supplier=Digikey, ComponentLink5Description=https://datasheet.ciiva.com/8510/l0075s0083lqg15hs-8510877.pdf?src-supplier=Avnet, ComponentLink5URL=https://datasheet.ciiva.com/8510/l0075s0083lqg15hs-8510877.pdf?src-supplier=Avnet, ComponentLink6Description=https://datasheet.ciiva.com/16208/l0075s0083lqg15hs-16208342.pdf?src-supplier=Future+Electronics, ComponentLink6URL=https://datasheet.ciiva.com/16208/l0075s0083lqg15hs-16208342.pdf?src-supplier=Future+Electronics, Core Material=Air, DC Current=300mA, Depth=0.55mm, Height=0.5mm, Height - Seated (Max)=0.022inch, Item Type=Inductor, Lead Free="Lead Free", Length=1mm, Manufacturer Part Number=LQG15HS8N2J02D, Max Current Rating=300mA, Max DC Current=300mA, Military Standard=Not, Mounting Technology="Surface Mount", Packaging="Tape and Reel", Pricing="1=0.1, 10=0.037, 50=0.037, 100=0.029, 1000=0.022, 10000=0.018 (USD)", Q Factor=8, RoHS=Yes, RoHS Compliant=Yes, Series=LQG15HS, Shielding=Unshielded, Stock=748, Supplier=Mouser, Termination=SMD/SMT, Weight=2.3E-05oz, Width=0.02inch
L3: library part CS0402-3N9J-S, "840mA 3.9nH ±5% 66mΩ 0402 Inductors (SMD) ROHS", LCSC Part Number=C329623, Manufacturer="Chilisin Elec", Package=0402, ComponentLink1Description=LCSC, ComponentLink1URL=https://www.lcsc.com/product-detail/Inductors-SMD_Chilisin-Elec-CS0402-3N9J-S_C329623.html, Item Type=Inductor, Manufacturer Part Number=CS0402-3N9J-S